# Altium PCB PCB2.PcbDoc
Units mm, origin at the board's own origin, x right, y up, seen from the top; angles counter-clockwise.
Board outline 174.88 x 101.98 mm, 4 copper layers (SIGNAL/POWER1, GND1, GND2, SIGNAL/POWER2), stack 0.603 mm thick; 123 components, 74 nets, 366 pads, 6 vias.
Unrouted connection lines stored in the file: 192.
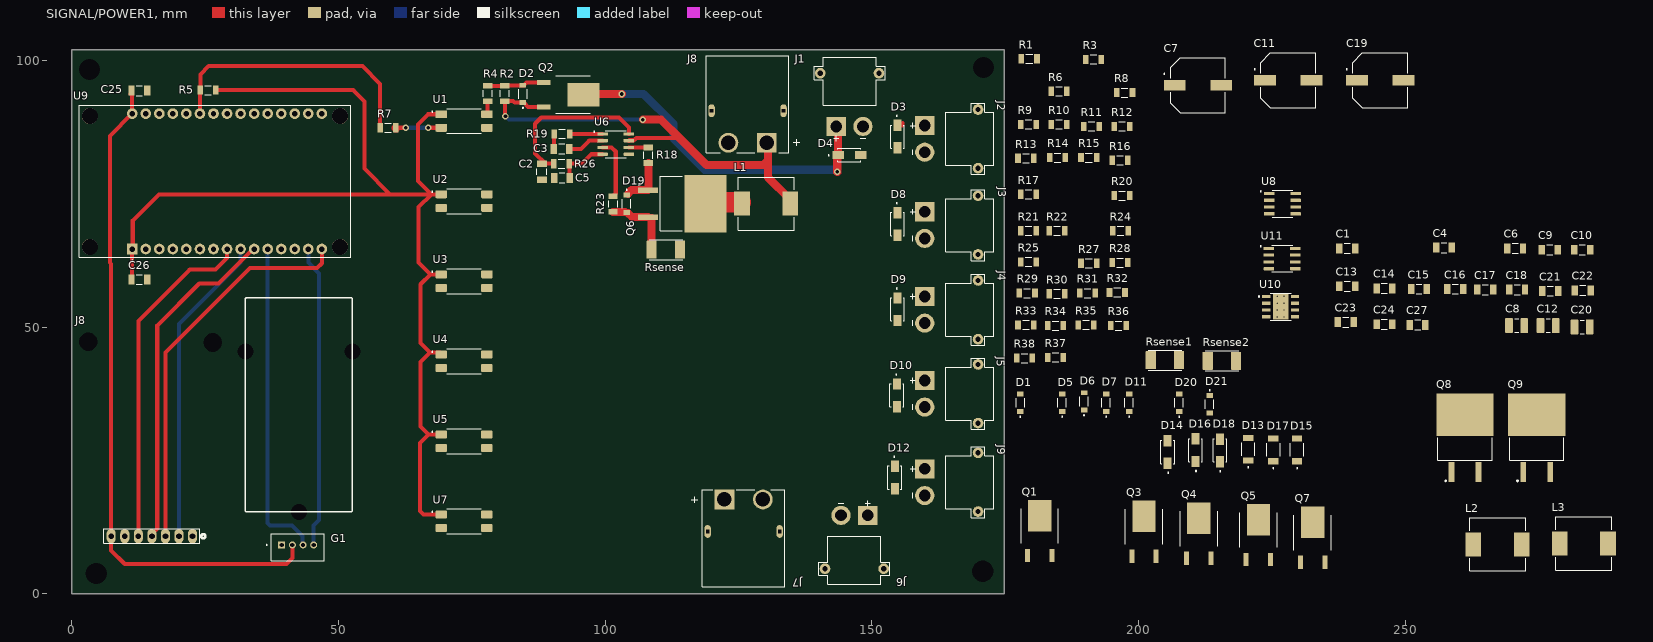
[diagram p0: SIGNAL/POWER1 view]
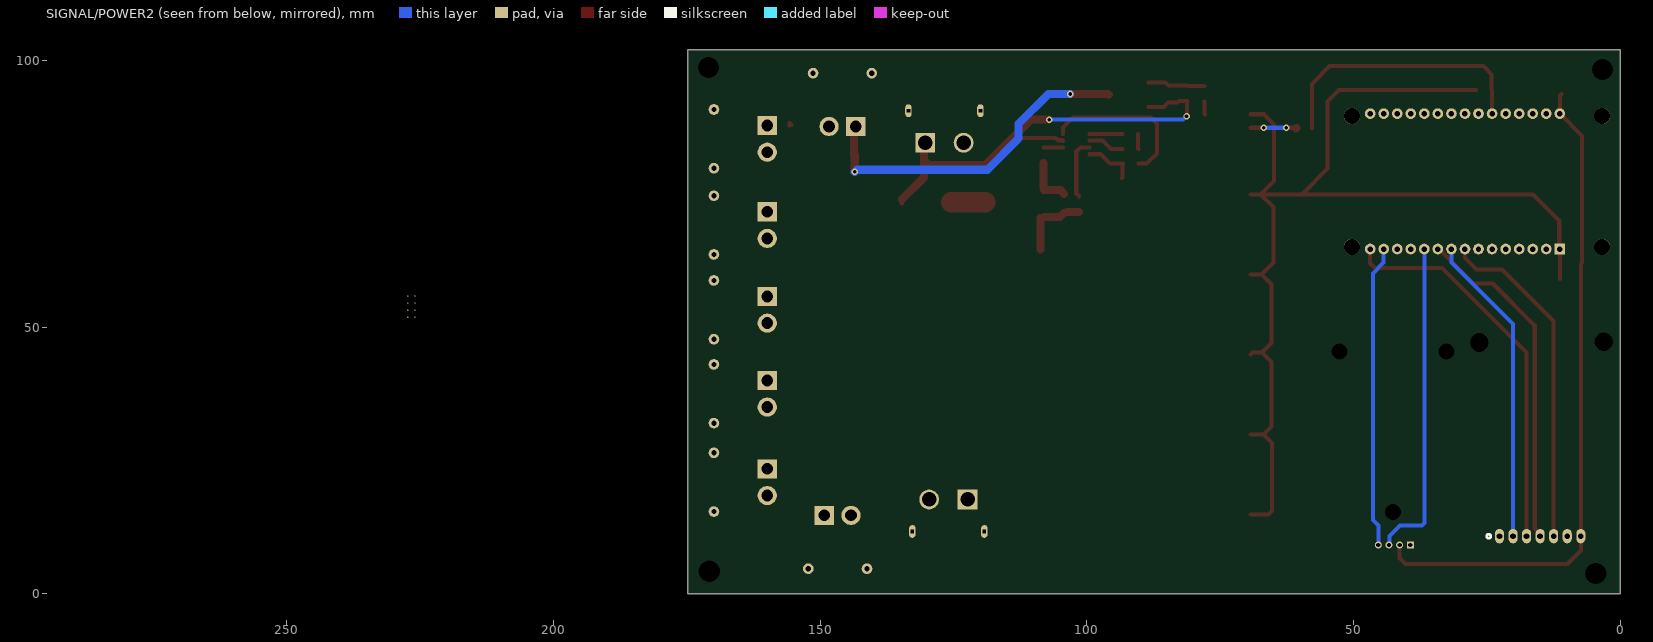
[diagram p1: SIGNAL/POWER2 view, seen from below]

## Layer stack, top to bottom
Top Solder: solder mask 0.0102, Solder Resist, Dk 3.5
SIGNAL/POWER1: signal copper 0.035
Dielectric 2: prepreg 0.0711, PP-006, Dk 4.1
GND1: signal copper 0.0356
Dielectric 1: dielectric 0.32, FR-4, Dk 4.8
GND2: signal copper 0.0356
Dielectric 3: prepreg 0.0711, PP-006, Dk 4.1
SIGNAL/POWER2: signal copper 0.035
Bottom Solder: solder mask 0.0102, Solder Resist, Dk 3.5

## Board outline
0,0 174.879,0 174.879,101.981 0,101.981

## Design rules (kind name [scope] priority, off if disabled: settings)
AssemblyTestPointUsage [All] p1: isadvanced=TRUE
AssemblyTestpoint [All] p1: isadvanced=TRUE testpointundercomponent=TRUE minsize=1.016 maxsize=2.54 preferedsize=1.524 minholesize=0 maxholesize=1.016 preferedholesize=0.813 testpointgrid=0.025 usegrid=TRUE gridtolerance=0 allowsidetop=TRUE allowsidebottom=TRUE
Clearance Clearance_1 [(ExistsOnLayer('GND1') Or ExistsOnLayer('GND2')) vs (ExistsOnLayer('GND1') Or ExistsOnLayer('GND2'))] p1: gap=0.254 ignorepadtopadclearanceinfootprint=FALSE sourcerule=38 cellrowname=All cellrowtype=0 cellcolname=All cellcoltype=0 innerlayers=TRUE
Clearance Clearance_2 [(ExistsOnLayer('SIGNAL/POWER1') Or ExistsOnLayer('SIGNAL/POWER2')) vs (ExistsOnLayer('SIGNAL/POWER1') Or ExistsOnLayer('SIGNAL/POWER2'))] p2: gap=0.254 ignorepadtopadclearanceinfootprint=FALSE sourcerule=38 cellrowname=All cellrowtype=0 cellcolname=All cellcoltype=0 outerlayers=TRUE
Clearance [All] p3: gap=0.254 ignorepadtopadclearanceinfootprint=FALSE ismatrix=TRUE
ComponentClearance [All] p1: isadvanced=TRUE gap=0.254 collisioncheckmode=3 verticalgap=0.254 showdistances=FALSE
FabricationTestPointUsage [All] p1: isadvanced=TRUE valid=0 allowmultiple=FALSE
FabricationTestpoint [All] p1: isadvanced=TRUE side=3 testpointundercomponent=TRUE minsize=1.016 maxsize=2.54 preferedsize=1.524 minholesize=0 maxholesize=1.016 preferedholesize=0.813 testpointgrid=0.025 allowsidetop=TRUE allowsidebottom=TRUE usegrid=TRUE gridtolerance=0
FanoutControl Fanout_BGA [IsBGA] p1: isadvanced=TRUE bgadir=Out bgaviamode=Centered fanoutstyle=Auto fanoutdirection=Alternating viagrid=0.025 // Fanout_BGA (Default Rule)
FanoutControl Fanout_LCC [IsLCC] p2: isadvanced=TRUE bgadir=Out bgaviamode=Centered fanoutstyle=Auto fanoutdirection=Alternating viagrid=0.025 // Fanout_LCC (Default Rule)
FanoutControl Fanout_SOIC [IsSOIC] p3: isadvanced=TRUE bgadir=Out bgaviamode=Centered fanoutstyle=Auto fanoutdirection=Alternating viagrid=0.025 // Fanout_SOIC (Default Rule)
FanoutControl Fanout_Small [(CompPinCount < 5)] p4: isadvanced=TRUE bgadir=Out bgaviamode=Centered fanoutstyle=Auto fanoutdirection=OutThenIn viagrid=0.025 // Fanout_Small (Default Rule)
FanoutControl Fanout_Default [All] p5: isadvanced=TRUE bgadir=Out bgaviamode=Centered fanoutstyle=Auto fanoutdirection=Alternating viagrid=0.025 // Fanout_Default (Default Rule)
Height [All] p1: isadvanced=TRUE minheight=0 maxheight=25.4 prefheight=12.7
HoleSize [All] p1: isadvanced=TRUE absolutevalues=TRUE maxlimit=2.54 minlimit=0.025 maxpercent=80.000 minpercent=20.000
HoleToHoleClearance [All] p1: isadvanced=TRUE gap=0.254 allowstackedmicrovias=TRUE
LayerPairs [All] p1: isadvanced=TRUE enforce=TRUE
MinimumSolderMaskSliver [All] p1: isadvanced=TRUE minsoldermaskwidth=0.254
NetAntennae [All] p1: isadvanced=TRUE netantennaetolerance=0
PasteMaskExpansion [All] p1: isadvanced=TRUE expansion=0
PlaneClearance [All] p1: isadvanced=TRUE clearance=0.508
PlaneConnect [All] p1: isadvanced=TRUE planeconnectstyle=Relief reliefexpansion=0.508 reliefentries=4 reliefconductorwidth=0.254 reliefairgap=0.254
PolygonConnect [All] p1: connectstyle=Relief reliefconductorwidth=0.254 reliefentries=4 polygonreliefangle="90 Angle" airgapwidth=0.254
RoutingCorners [All] p1: isadvanced=TRUE cornerstyle=45-Degree minsetback=2.54 maxsetback=2.54
RoutingPriority [All] p1: isadvanced=TRUE routingpriority=0
RoutingVias [All] p1: holewidth=0.711 width=1.27 viastyle="Through Hole" minholewidth=0.711 minwidth=1.27 maxholewidth=0.711 maxwidth=1.27
ShortCircuit [All] p1: isadvanced=TRUE allowed=FALSE
SilkToSilkClearance [All] p1: isadvanced=TRUE silktosilkclearance=0.254
SilkToSolderMaskClearance [IsPad] p1: isadvanced=TRUE minsilkscreentomaskgap=0.254 clearancetoexposedcopper=TRUE
SolderMaskExpansion [All] p1: isadvanced=TRUE expansion=0 istentingtop=FALSE
SupplyNets "Schematic Supply Nets" [InNet('GND')] p1: isadvanced=TRUE voltage=0.000
UnRoutedNet [All] p1: isadvanced=TRUE
UnpouredPolygon [All] p1: isadvanced=TRUE
Width MaxMinWidth_1 [All] p1: isadvanced=TRUE maxlimit=3.81 minlimit=0.762 preferedwidth=1.524 toplayer_prefwidth=0.762 minimp=50.000000 maximp=50.000000 favimp=50.000000
Width [All] p2: maxlimit=0.254 minlimit=0.254 preferedwidth=0.254
4 further rules are at their usual default settings.

## Classes and differential pairs
component class Fuentes: C1 C2 C3 C4 C5 C6 C7 C8 C9 C10 C11 C12 C13 C14 C15 C16 C17 C18 C19 C20 C21 C22 C23 C24 C? D11 D12 D13 D14 D15 D16 D17 D18 D19 D20 D21 J9 L1 L2 L3 Q6 Q7 Q8 Q9 Q? R18 R19 R20 R21 R22 R23 R24 R25 R26 R27 R28 R29 R30 R31 R32 R33 R34 R35 R36 R37 R38 Rsense Rsense1 Rsense2 U6 U7 U8 U11
component class Control: 3 C25 C26 C27 D1 D2 D3 D4 D5 D6 D7 D8 D9 D10 G1 J1 J2 J3 J4 J5 J6 J7 Q1 Q2 Q3 Q4 Q5 R1 R2 R3 R4 R5 R6 R7 R8 R9 R10 R11 R12 R13 R14 R15 R16 R17 U1 U2 U3 U4 U5 U10

## Components (designator, comment, footprint, x,y, rotation, side; value= is the part's Value field where it differs from the comment)
C1 "100nF" "Cap SMD 1206" 239.141,64.77 r0 top
C2 "100nF" "Cap SMD 1206" 88.138,79.121 r270 top
C3 "10nF" "Cap SMD 1206" 91.821,83.439 r180 top
C4 "100pF" "Cap SMD 1206" 257.302,64.897 r0 top
C5 "1nF" "Cap SMD 1206" 91.901,77.978 r180 top
C6 "10uF" "Cap SMD 1206" 270.637,64.77 r0 top
C7 "Cap 100uF 63v" "Cap 100uH 63v" 211.169,95.25 r0 top
C8 "10uF 100v" "Cap SMD 1210" 270.924,50.292 r0 top
C9 "100nF" "Cap SMD 1206" 277.114,64.516 r0 top
C10 "10uF" "Cap SMD 1206" 283.21,64.516 r0 top
C11 "Cap 100uF 63v" "Cap 100uH 63v" 228.092,96.139 r0 top
C12 "10uF 100v" "Cap SMD 1210" 276.827,50.292 r0 top
C13 "100nF" "Cap SMD 1206" 239.141,57.658 r0 top
C14 "1nF" "Cap SMD 1206" 246.126,57.277 r0 top
C15 "100pF" "Cap SMD 1206" 252.603,57.15 r0 top
C16 "10nF" "Cap SMD 1206" 259.414,57.15 r0 top
C17 "100nF" "Cap SMD 1206" 265.049,57.023 r0 top
C18 "10uF" "Cap SMD 1206" 271.018,57.023 r0 top
C19 "Cap 100uF 63v" "Cap 100uH 63v" 245.364,96.139 r0 top
C20 "10uF 100v" "Cap SMD 1210" 283.21,50.038 r0 top
C21 "100nF" "Cap SMD 1206" 277.241,56.769 r0 top
C22 "1nF" "Cap SMD 1206" 283.337,56.896 r0 top
C23 "100pF" "Cap SMD 1206" 238.887,50.927 r0 top
C24 "10nF" "Cap SMD 1206" 246.126,50.546 r0 top
C25 "100nF" "Cap SMD 1206" 12.649,94.361 r0 top
C26 "100nF" "Cap SMD 1206" 12.649,58.928 r0 top
C27 "100nF" "Cap SMD 1206" 252.349,50.419 r0 top
D1 "Zener 15v" "Zener 15v 500mW SMD" 177.859,35.814 r90 top
D2 "Zener 15v" "Zener 15v 500mW SMD" 84.582,93.726 r90 top
D3 "Diodo TVS" "Diodo TVS" 154.813,85.725 r270 top
D4 "Diodo TVS" "Diodo TVS" 145.796,82.296 r0 top
D5 "Zener 15v" "Zener 15v 500mW SMD" 185.674,35.814 r90 top
D6 "Zener 15v" "Zener 15v 500mW SMD" 189.797,36.068 r90 top
D7 "Zener 15v" "Zener 15v 500mW SMD" 193.929,35.83 r90 top
D8 "Diodo TVS" "Diodo TVS" 154.813,69.342 r270 top
D9 "Diodo TVS" "Diodo TVS" 154.813,53.34 r270 top
D10 "Diodo TVS" "Diodo TVS" 154.686,37.211 r270 top
D11 "Zener 15v" "Zener 15v 500mW SMD" 198.247,35.83 r90 top
D12 "Diodo TVS" "Diodo TVS" 154.305,21.8 r270 top
D13 "Diodo Shottky" "Diodo Sottky SS510FSH" 220.599,27.095 r90 top
D14 "Diodo TVS" "Diodo SMAJ28A TVS" 205.486,26.587 r90 top
D15 "Diodo Shottky" "Diodo Sottky SS510FSH" 229.743,26.968 r90 top
D16 "Diodo TVS" "Diodo SMAJ28A TVS" 210.693,26.924 r90 top
D17 "Diodo Shottky" "Diodo Sottky SS510FSH" 225.298,26.968 r90 top
D18 "Diodo TVS" "Diodo SMAJ28A TVS" 215.265,26.88 r90 top
D19 "Zener 15v" "Zener 15v 500mW SMD" 104.013,73.136 r270 top
D20 "Zener 15v" "Zener 15v 500mW SMD" 207.645,35.814 r90 top
D21 "Zener 15v" "Zener 15v 500mW SMD" 213.36,35.56 r270 top
G1 "4pin Grove connector" "4 pin grove conector" 42.339,9.144 r0 top
J1 "xt30_90" XT30_90 146.369,78.504 r0 top
J2 "xt30_90" XT30_90 150.802,84.772 r270 top
J3 "xt30_90" XT30_90 150.802,68.594 r270 top
J4 "xt30_90" XT30_90 150.802,52.719 r270 top
J5 "xt30_90" XT30_90 150.802,36.971 r270 top
J6 "xt30_90" XT30_90 146.191,23.825 r180 top
J7 "Xt60_90" Xt60_90 128.886,-27.305 r0 top
J8 "MCP2515" MCP2515 15.367,30.226 r270 top
J8 "Xt60_90" Xt60_90 123.781,129.571 r180 top
J9 "xt30_90" XT30_90 150.802,20.383 r270 top
L1 "33uH inductor" "33uH Inductor" 130.302,73.152 r180 top
L2 "33uH inductor" "33uH Inductor" 267.208,9.271 r0 top
L3 "33uH inductor" "33uH Inductor" 283.417,9.398 r0 top
Q1 "IRF5505" irf5505 181.483,12.7 r0 top
Q2 "IRF5505" irf5505 93.98,93.599 r270 top
Q3 "IRF5505" irf5505 201.041,12.573 r0 top
Q4 "IRF5505" irf5505 211.328,12.192 r0 top
Q5 "IRF5505" irf5505 222.504,11.938 r0 top
Q6 "IRFS4010" IRFS4010 113.411,73.152 r0 top
Q7 "IRF5505" irf5505 232.664,11.43 r0 top
Q8 "IRFS4010" IRFS4010 261.239,28.194 r90 top
Q9 "IRFS4010" IRFS4010 274.701,28.194 r90 top
R1 "10k" "Resistencia 1306" 164.655,101.219 r0 top
R2 "10k" "Resistencia 1306" 80.264,78.93 r90 top
R3 "22k" "Resistencia 1306" 176.721,101.092 r0 top
R4 "22k" "Resistencia 1306" 77.089,78.931 r90 top
R5 "10k" "Resistencia 1306" 40.399,93.552 r180 top
R6 "330" "Resistencia 1306" 170.244,95.123 r0 top
R7 "330" "Resistencia 1306" 74.105,86.487 r180 top
R8 "10k" "Resistencia 1306" 182.562,94.869 r0 top
R9 "10k" "Resistencia 1306" 164.503,88.9 r0 top
R10 "10k" "Resistencia 1306" 170.218,88.9 r0 top
R11 "22k" "Resistencia 1306" 176.314,88.519 r0 top
R12 "22k" "Resistencia 1306" 182.029,88.519 r0 top
R13 "22k" "Resistencia 1306" 164.02,82.55 r0 top
R14 "330" "Resistencia 1306" 169.99,82.677 r0 top
R15 "330" "Resistencia 1306" 175.831,82.677 r0 top
R16 "330" "Resistencia 1306" 181.673,82.169 r0 top
R17 "Resistencia 1206 SMD" "Resistencia 1306" 164.528,75.819 r0 top
R18 "10" "Resistencia 1306" 108.966,97.091 r270 top
R19 "10K" "Resistencia 1306" 77.025,87.122 r0 top
R20 "10k" "Resistencia 1306" 182.054,75.565 r0 top
R21 "22k" "Resistencia 1306" 164.529,68.961 r0 top
R22 "330" "Resistencia 1306" 169.862,68.961 r0 top
R23 "1k" "Resistencia 1306" 102.362,87.947 r270 top
R24 "180k" "Resistencia 1306" 211.519,67.183 r180 top
R25 "9.88k" "Resistencia 1306" 194.246,61.341 r180 top
R26 "9.53k" "Resistencia 1306" 76.945,81.534 r0 top
R27 "180k" "Resistencia 1306" 205.549,61.087 r180 top
R28 "9.53k" "Resistencia 1306" 211.392,61.214 r180 top
R29 "1k" "Resistencia 1306" 193.993,55.499 r180 top
R30 "10" "Resistencia 1306" 169.862,57.15 r0 top
R31 "9.88k" "Resistencia 1306" 205.296,55.499 r180 top
R32 "10K" "Resistencia 1306" 181.166,57.404 r0 top
R33 "180k" "Resistencia 1306" 193.738,49.53 r180 top
R34 "9.53k" "Resistencia 1306" 199.326,49.403 r180 top
R35 "1k" "Resistencia 1306" 205.041,49.53 r180 top
R36 "10" "Resistencia 1306" 181.42,51.181 r0 top
R37 "9.88k" "Resistencia 1306" 199.327,43.434 r180 top
R38 "10K" "Resistencia 1306" 163.766,45.085 r0 top
Rsense "0.15" "R SMD 2512" 111.379,64.516 r180 top
Rsense1 "0.15" "R SMD 2512" 204.978,43.815 r0 top
Rsense2 "0.15" "R SMD 2512" 215.653,43.688 r180 top
U1 "PC817X3NSZ1B" PC817X3NSZ1B 73.406,88.646 r0 top
U2 "PC817X3NSZ1B" PC817X3NSZ1B 73.406,73.635 r0 top
U3 "PC817X3NSZ1B" PC817X3NSZ1B 73.406,58.623 r0 top
U4 "PC817X3NSZ1B" PC817X3NSZ1B 73.406,43.612 r0 top
U5 "PC817X3NSZ1B" PC817X3NSZ1B 73.406,28.6 r0 top
U6 "UC2843NG4" UC3843 102.108,84.328 r0 top
U7 "PC817X3NSZ1B" PC817X3NSZ1B 73.406,13.589 r0 top
U8 "UC2843NG4" UC3843 227.133,73.152 r0 top
U9 "Esp32 30 pin" "ESP32 30 pin" 24.586,76.276 r90 top
U10 "DRV8871" DRV8871 226.807,53.579 r0 top
U11 "UC2843NG4" UC3843 227.076,62.865 r0 top

## Footprints (in the part's own frame and the unit in brackets; to place one, negate y for a bottom-side part, rotate by r counter-clockwise, add the part's x,y. Pads: shape width x height; smd on the part's side, far side on the other; paste and mask are expansions set on the pad)
"4 pin grove conector" [mm]
  rect 1.308x1.308 / inner round 1.308 / far side rect 1.308x1.308 hole 0.8: 1(-3,0)
  round 1.308 hole 0.8: 2(-1,0) 3(1,0) 4(3,0)
  silkscreen extent -5.9,-2.95 5,2.15, body extent -5,-2.95 5,2.15, height 8.1
"33uH Inductor" [mm]
  rect 2.95x4.5 smd: 1(-4.398,0) 2(4.652,0)
  silkscreen extent -5.12,-5 5.38,5, body extent -5.12,-5 5.38,5, height 6.51
"Cap 100uH 63v" [mm]
  rect 4.1x2 smd: 1(-4.35,0.127) 2(4.35,0.127)
  silkscreen extent -6.4,-5.02 5.15,5.28, body extent -5.5,-5.02 5.5,5.28, height 11.52
"Cap SMD 1206" [mm]
  rect 1.21x1.86 smd: 1(-1.477,0) 2(1.477,0)
  silkscreen extent -0.55,-0.93 0.55,0.93, body extent -1.6,-0.8 1.6,0.8, height 1.7
"Cap SMD 1210" [mm]
  rrect25% 1.45x2.81 smd paste+0 mask+0.102: 1(-1.43,0) 2(1.43,0)
  silkscreen extent -0.39,-1.25 0.39,1.25, body extent -1.6,-1.25 1.6,1.25, height 2.8
"Diodo SMAJ28A TVS" [mm]
  rect 2.12x1.5 smd: A(2.115,0) C(-2.115,0)
  silkscreen extent -4,-1.28 2.16,1.28, body extent -2.57,-1.28 2.57,1.28, height 2.5
"Diodo Sottky SS510FSH" [mm]
  rect 1.17x1.92 smd: A(2.125,0) C(-2.125,0)
  silkscreen extent -3.5,-1.25 1.22,1.25, body extent -2.35,-1.25 2.35,1.25, height 1.1
"Diodo TVS" [mm]
  rect 2.12x1.5 smd: A(2.115,0) C(-2.115,0)
  silkscreen extent -4,-1.28 2.16,1.28, body extent -2.47,-1.3 2.72,1.3, height 2.21
DRV8871 [mm]
  rrect5% 1.55x0.6 smd mask+0: 1(-2.827,2.159) 2(-2.827,0.889) 3(-2.827,-0.381) 4(-2.827,-1.651) 5(2.573,-1.651) 6(2.573,-0.381) 7(2.573,0.889) 8(2.573,2.159)
  rect 2.95x4.9 smd paste-3 mask+0: 9(-0.127,0.254)
  round 0.3 hole 0.2: 10(-0.777,2.204) 11(0.523,2.204) 12(-0.777,0.904) 13(0.523,0.904) 14(-0.777,-0.396) 15(0.523,-0.396) 16(-0.777,-1.696) 17(0.523,-1.696)
  silkscreen extent -4.3,-2.27 1.82,2.78, body extent -3.13,-2.2 2.87,2.7, height 1.7
"ESP32 30 pin" [mm]
  rect 2x2 / inner round 2 / far side rect 2x2 hole 1.02: 1(-11.633,13.28)
  round 2 hole 1.02: 2(-11.633,10.74) 3(-11.633,8.2) 4(-11.633,5.66) 5(-11.633,3.12) 6(-11.633,0.58) 7(-11.633,-1.96) 8(-11.633,-4.5) 9(-11.633,-7.04) 10(-11.633,-9.58) 11(-11.633,-12.12) 12(-11.633,-14.66) 13(-11.633,-17.2) 14(-11.633,-19.74) 15(-11.633,-22.28) 16(13.767,-22.28) 17(13.767,-19.74) 18(13.767,-17.2) 19(13.767,-14.66) 20(13.767,-12.12) 21(13.767,-9.58) 22(13.767,-7.04) 23(13.767,-4.5) 24(13.767,-1.96) 25(13.767,0.58) 26(13.767,3.12) 27(13.767,5.66) 28(13.767,8.2) 29(13.767,10.74) 30(13.767,13.28)
  round 3 hole 3 unplated: ""(-11.213,21.24) ""(-11.213,-25.71) ""(13.297,21.24) ""(13.297,-25.71)
  silkscreen extent -13.88,-27.71 15.3,23.24, body extent -12.85,-27.86 15.35,24.59, height 7.05
irf5505 [mil]
  rect 37x98 smd: 1(-90.16,-217.5) 3(90.16,-217.5)
  rect 172x233 smd: 2(0,77)
  silkscreen extent -138,-128 138,128, body extent -129,-225 129,165, height 94
IRFS4010 [mm]
  rect 3.8x1.05 smd paste+0 mask+0: 1(-5.375,2.54) 3(-5.375,-2.54)
  rect 7.9x10.75 smd paste+0 mask+0: 2(5.375,0)
  silkscreen extent -7.15,-5.1 1.08,5.1, body extent -6.6,-5.08 8.65,5.08, height 5.08
MCP2515 [mm]
  oval 2.7x1.7 hole 1.1: Cs(19.431,-2.921) GND(19.431,-5.461) Int(19.431,7.239) Miso(19.431,-0.381) Mosi(19.431,2.159) Sck(19.431,4.699) Vcc(19.431,-8.001)
  silkscreen extent 18.06,-9.4 20.8,9.65, body extent -19.42,-14.51 20.7,13.49, height 11.69
PC817X3NSZ1B [mm]
  rrect25% 2.15x1.48 smd: 1(-4.153,1.27) 2(-4.153,-1.27) 3(4.407,-1.27) 4(4.407,1.27)
  silkscreen extent -5.9,-2.33 3.38,2.33, body extent -4.75,-2.29 5,2.29, height 4
"R SMD 2512" [mm]
  rrect7% 1.9x3.37 smd: 1(-2.66,0) 2(2.66,0)
  silkscreen extent -3.15,-1.87 3.15,1.87, body extent -3.18,-1.58 3.18,1.58, height 0.7
"Resistencia 1306" [mm]
  rect 1.05x1.72 smd: 1(13.399,-0.889) 2(16.319,-0.889)
  silkscreen extent 14.24,-1.74 15.48,-0.04, body extent 13.31,-1.66 16.41,-0.11, height 0.65
UC3843 [mm]
  rrect25% 1.97x0.6 smd paste+0 mask+0.102: 1(-2.597,1.905) 2(-2.597,0.635) 3(-2.597,-0.635) 4(-2.597,-1.905) 5(2.343,-1.905) 6(2.343,-0.635) 7(2.343,0.635) 8(2.343,1.905)
  silkscreen extent -4.27,-2.52 1.82,2.52, body extent -3.12,-2.45 2.87,2.45, height 1.75
XT30_90 [mm]
  round 3.6 hole 2.2: N(1.967,9.126)
  rect 3.6x3.6 hole 2.2: P(-3.033,9.126)
  round 2 hole 1: S1(4.967,19.126) S2(-6.033,19.126)
  silkscreen extent -7.18,6.38 6.12,22.08, body extent -7.18,8.13 6.12,22.08, height 5
Xt60_90 [mm]
  rect 3.716x3.716 / inner round 3.716 / far side rect 3.716x3.716 hole 2.7 mask+0.102: 1(-6.521,44.989)
  round 3.716 hole 2.7 mask+0.102: 2(0.679,44.989)
  oval 1.2x2.4 hole 0.6 square mask+0.102: SH1(-9.671,38.989) SH2(3.829,38.989)
  silkscreen extent -12.72,28.64 4.83,46.84, body extent -10.67,28.64 4.83,46.84, height 8.4
"Zener 15v 500mW SMD" [mm]
  rect 0.91x1.22 smd paste+0 mask+0.102: 1(-1.635,0) 2(1.635,0)
  silkscreen extent -2.7,-0.8 0.86,0.8, body extent -1.84,-0.8 1.84,0.8, height 1.35

## Part data
C1 C2 C3 C4 C5 C6 C9 C10 C13 C14 C15 C16 C17 C18 C21 C22 C23 C24 C25 C26 C27: library part "Cap SMD 1206"
C7 C11 C19: library part "Cap 100uH 63v"
C8 C12 C20: library part "Cap SMD 1210"
D1 D2 D5 D6 D7 D11 D19 D20 D21: library part "Zener 15v 500mW SMD"
D3 D4 D8 D9 D10 D12: library part "Diodo TVS SMAJ51"
D14 D16 D18: library part "Diodo SMAJ28A TVS"
R1 R2 R3 R4 R5 R6 R7 R8 R9 R10 R11 R12 R13 R14 R15 R16 R17 R18 R19 R20 R21 R22 R23 R24 R25 R26 R27 R28 R29 R30 R31 R32 R33 R34 R35 R36 R37 R38: library part "Resistencia 1306 SMD"
Rsense Rsense1 Rsense2: library part "R SMD 2512"
U9: "Dual core, Wi-Fi: 2.4 GHz up to 150 Mbits/s,BLE (Bluetooth Low Energy) and legacy Bluetooth, 32 bits, Up to 240 MHz"

## Free pads (board coordinates)
  round 1.524 hole 4: 4(3.302,98.298) 4(4.572,3.81) 4(170.815,4.191) 4(170.942,98.679)
  round 1.524 hole 3: 4(32.512,45.466) 4(42.545,15.367) 4(52.578,45.466)
  round 1.524 hole 3.5: 23(3.048,47.244) 23(26.416,47.117)

## Via types
v1: diameter 1.27, hole 0.711, SIGNAL/POWER1 to SIGNAL/POWER2, 4 vias
v2: diameter 1.27, hole 0.7, SIGNAL/POWER1 to SIGNAL/POWER2, 2 vias

## Nets (pads, with @x,y where several pads share a name; then routed paths per layer and width w, separated by ;. In a path a pad name is that pad's centre, name@x,y a point inside that pad or via, vN(x,y) a via of type N, cw(c..) or ccw(c..) an arc to the next point about the centre after c; other vN are vias at no path point)
GND: C1.2 C2.2 C4.2 C5.2 C6.1 C7.2 C8.1 C9.2 C10.1 C11.2 C12.1 C13.2 C14.2 C15.2 C17.2 C18.1 C19.2 C20.1 C21.2 C22.2 C23.2 C25.2 C26.2 C27.1 D3.A D4.A D8.A D9.A D10.A D12.A D14.A D16.A D18.A G1.1 J1.N J2.N J3.N J4.N J5.N J7.2 J7.SH1 J7.SH2 J8.2 J8.GND J8.SH1 J8.SH2 J9.N R17.2 R25.1 R31.1 R37.1 Rsense1.1 Rsense2.1 Rsense.1 U1.3 U2.3 U3.3 U4.3 U5.3 U6.5 U7.3 U8.5 U9.2 U9.29 U10.1 U10.7 U11.5
NetC1_1: C1.1 C6.2 C9.1 C10.2 C17.1 C18.2 D2.1 D6.1 D7.1 D14.C D16.C D18.C J8.1 L1.1 L2.1 L3.1 Q2.3 Q4.3 Q5.3 R2.1 R9.1 R10.1 U6.7 U8.7 U11.7 | length 87.9
  SIGNAL/POWER1 w0.762: v1(81.28,89.535) 81.216,89.599 81.216,92.266 R2.1 81.247,92.423 82.71,92.423 83.042,92.091 D2.1 84.737,92.091 85.519,91.309 Q2.3 ; L1.1 L1.1@134.7,73.927
  SIGNAL/POWER1 w0.8: U6.7 104.551,85.063 105.368,85.063 105.584,85.279 105.663,85.279 105.855,85.471 113.919,85.471
  SIGNAL/POWER1 w1.5: v1(107.061,88.9) 110.49,88.9 113.919,85.471 ; 130.556,82.169 130.556,78.071 L1.1@134.7,73.927
  SIGNAL/POWER1 w1.52: 113.919,85.471 118.999,80.391 129.666,80.391 130.556,81.281 130.556,82.169 130.556,84.328 J8.1
  SIGNAL/POWER2 w0.762: v1(81.28,89.535) 81.345,89.535 81.98,88.9 v1(107.061,88.9)
NetC2_1: C2.1 R26.1 U6.8 | length 29.9
  SIGNAL/POWER1 w0.762: R26.1 88.773,80.645 86.868,82.55 86.868,88.138 88.011,89.281 102.616,89.281 104.451,87.446 U6.8
NetC3_1: C3.1 R24.1 R25.2 U6.2 | length 6.8
  SIGNAL/POWER1 w0.762: C3.1 95.493,83.439 97.017,84.963 U6.2
NetC3_2: C3.2 R19.1 | length 2.8
  SIGNAL/POWER1 w0.762: C3.2 90.384,83.479 90.384,86.193 R19.1
NetC4_1: C4.1 R23.1 U6.3 | length 11.4
  SIGNAL/POWER1 w0.762: U6.3 101.219,83.693 101.981,82.931 101.981,75.056 R23.1
NetC5_1: C5.1 R26.2 U6.4 | length 9.7
  SIGNAL/POWER1 w0.762: C5.1 93.321,78.035 93.321,80.588 R26.2 95.631,80.645 97.409,82.423 U6.4
NetC7_1: C7.1 C8.2 D1.1 D13.C Q1.3 R1.1 R24.2
NetC11_1: C11.1 C12.2 D5.1 D15.C Q3.3 R8.1 R27.2
NetC13_1: C13.1 R28.1 U8.8
NetC14_1: C14.1 R28.2 U8.4
NetC15_1: C15.1 R29.2 U8.3
NetC16_1: C16.1 R27.1 R31.2 U8.2
NetC16_2: C16.2 R32.1
NetC19_1: C19.1 C20.2 D11.1 D17.C Q7.3 R20.1 R33.2
NetC21_1: C21.1 R34.1 U11.8
NetC22_1: C22.1 R34.2 U11.4
NetC23_1: C23.1 R35.2 U11.3
NetC24_1: C24.1 R33.1 R37.2 U11.2
NetC24_2: C24.2 R38.1
NetC25_1: C25.1 G1.2 J8.Vcc U9.30 | length 125.2
  SIGNAL/POWER1 w0.762: C25.1@10.998,93.714 11.24,93.472 11.24,90.415 U9.30@11.307,90.348 ; U9.30 7.112,85.849 7.112,62.103 7.366,61.849 J8.Vcc 7.366,8.128 9.906,5.588 40.259,5.588 41.339,6.668 G1.2
NetC26_1: C26.1 R5.1 U1.1 U2.1 U3.1 U4.1 U5.1 U7.1 U9.1 | length 214
  SIGNAL/POWER1 w0.762: C26.1@11.24,58.996 U9.1@11.24,64.643 ; U9.1 U9.1@11.43,64.767 ; 11.43,69.977 16.358,74.905 59.69,74.905 ; R5.1 52.752,94.441 54.864,92.329 54.864,79.731 59.69,74.905 ; U7.1 65.913,14.859 65.278,15.494 65.278,28.245 66.904,29.87 ; U5.1 66.904,29.87 ; U4.1 68.894,45.241 67.154,45.241 ; U3.1 67.259,59.893 ; U2.1 67.412,74.905 ; U1.1 66.802,89.916 64.897,88.011 64.897,77.419 67.412,74.905 ; 59.69,74.905 67.412,74.905 ; 66.904,29.87 65.405,31.369 65.405,43.492 67.154,45.241 ; 67.154,45.241 65.405,46.99 65.405,58.039 67.259,59.893 ; 67.259,59.893 65.024,62.128 65.024,72.517 67.412,74.905
  SIGNAL/POWER1 w0.8: U9.1@11.43,64.767 11.43,69.977
NetC27_2: C27.2 J7.1 U10.5
NetD1_2: D1.2 Q1.1 R1.2 R3.2
NetD2_2: D2.2 Q2.1 R2.2 R4.2 | length 10.7
  SIGNAL/POWER1 w0.762: R4.2 R2.2 ; R2.2 81.209,95.305 84.681,95.305 85.265,95.889 Q2.1
NetD3_C: D3.C J2.P Q1.2 | length 0.6
  SIGNAL/POWER1 w0.762: D3.C@155.406,87.896 155.775,88.265 ; 155.775,87.84 155.775,87.896
NetD4_C: D4.C J1.P Q2.2 | length 64.2
  SIGNAL/POWER1 w0.762: J1.P J1.P@143.681,87.285
  SIGNAL/POWER1 w1.52: Q2.2 95.885,93.599 96.012,93.726 v2(103.124,93.726) ; v2(143.51,79.121) 143.51,82.286 143.52,82.296 D4.C J1.P@143.681,87.285
  SIGNAL/POWER2 w1.52: v2(103.124,93.726) 107.188,93.726 112.776,88.138 112.776,85.344 118.618,79.502 143.129,79.502 v2(143.51,79.121)
NetD5_2: D5.2 Q3.1 R8.2 R11.2
NetD6_2: D6.2 Q4.1 R9.2 R12.2
NetD7_2: D7.2 Q5.1 R10.2 R13.2
NetD8_C: D8.C J3.P Q3.2
NetD9_C: D9.C J4.P Q4.2
NetD10_C: D10.C J5.P Q5.2
NetD11_2: D11.2 Q7.1 R20.2 R21.2
NetD12_C: D12.C J9.P Q7.2
NetD13_A: D13.A L1.2 Q6.2 | length 6.4
  SIGNAL/POWER1 w3.81: Q6.2@119.04,73.406 L1.2@125.396,73.406
NetD15_A: D15.A L2.2 Q8.2
NetD17_A: D17.A L3.2 Q9.2
NetD19_1: D19.1 Q6.1 R18.2 | length 9.1
  SIGNAL/POWER1 w0.762: D19.1 104.168,74.771 104.242,74.845 D19.1@104.242,75.01
  SIGNAL/POWER1 w1.5: D19.1@104.242,75.01 104.924,75.692 Q6.1 ; Q6.1@108.036,76.2 108.077,76.241 R18.2
NetD19_2: D19.2 Q6.3 R23.2 Rsense.2 | length 13.4
  SIGNAL/POWER1 w0.762: D19.2@103.731,71.628 103.858,71.501 D19.2 ; Q6.3 108.575,70.612 Q6.3@108.719,70.468
  SIGNAL/POWER1 w1.5: R23.2 D19.2@103.731,71.628 ; D19.2@104.242,71.427 105.057,70.612 Q6.3 ; Rsense.2 Q6.3@108.719,70.468
NetD20_1: D20.1 Q8.1 R30.2
NetD20_2: D20.2 Q8.3 R29.1 Rsense1.2
NetD21_1: D21.1 Q9.1 R36.2
NetD21_2: D21.2 Q9.3 R35.1 Rsense2.2
NetG1_3: G1.3 U9.11 | length 60.7
  SIGNAL/POWER2 w0.762: U9.11@36.703,64.643 36.703,13.273 37.149,12.827 41.275,12.827 43.235,10.867 43.235,9.248 G1.3
NetG1_4: G1.4 U9.14 | length 56.8
  SIGNAL/POWER2 w0.762: U9.14 44.326,62.1 46.355,60.071 46.355,13.843 45.339,12.827 G1.4
NetJ6_N: J6.N U10.8
NetJ6_P: J6.P U10.6
NetJ8_Cs: J8.Cs U9.8 | length 63.6
  SIGNAL/POWER1 w0.762: J8.Cs 12.446,51.181 22.098,60.833 26.924,60.833 29.086,62.995 U9.8
NetJ8_Miso: J8.Miso U9.10 | length 64
  SIGNAL/POWER1 w0.762: J8.Miso 14.986,11.194 16.002,12.21 16.002,50.292 23.876,58.166 27.462,58.166 33.939,64.643 U9.10
NetJ8_Mosi: J8.Mosi U9.15 | length 73.4
  SIGNAL/POWER1 w0.762: J8.Mosi 17.526,45.212 33.401,61.087 45.974,61.087 46.866,61.979 U9.15
NetJ8_Sck: J8.Sck U9.9 | length 58.6
  SIGNAL/POWER2 w0.762: J8.Sck 20.066,50.546 31.623,62.103 31.623,62.611 31.626,62.614 U9.9
NetR3_1: R3.1 U2.4
NetR4_1: R4.1 U1.4 | length 2.5
  SIGNAL/POWER1 w0.762: U1.4 77.896,89.999 77.896,92.248 R4.1
NetR5_2: R5.2 R6.2 R7.2 R14.2 R15.2 R16.2 R22.2 U9.25 | length 51
  SIGNAL/POWER1 w0.762: U9.25@24.007,90.348 24.044,90.384 24.044,94.405 R5.2 24.08,97.359 25.654,98.933 54.483,98.933 57.786,95.63 R7.2
NetR6_1: R6.1 U2.2
NetR7_1: R7.1 U1.2 | length 8.6
  SIGNAL/POWER1 w0.8: R7.1@60.806,87.351 60.831,87.376 v1(62.611,87.376) ; v1(66.802,87.376) U1.2
  SIGNAL/POWER1 w1.52: R7.1 R7.1@60.806,87.276
  SIGNAL/POWER2 w0.8: v1(62.611,87.376) v1(66.802,87.376)
NetR11_1: R11.1 U3.4
NetR12_1: R12.1 U4.4
NetR13_1: R13.1 U5.4
NetR14_1: R14.1 U3.2
NetR15_1: R15.1 U4.2
NetR16_1: R16.1 U5.2
NetR17_1: R17.1 U10.4
NetR18_1: R18.1 U6.6 | length 3.6
  SIGNAL/POWER1 w0.762: U6.6@104.452,83.692 R18.1
NetR19_2: R19.2 U6.1 | length 6.2
  SIGNAL/POWER1 w0.762: R19.2 U6.1
NetR21_1: R21.1 U7.4
NetR22_1: R22.1 U7.2
NetR30_1: R30.1 U8.6
NetR32_2: R32.2 U8.1
NetR36_1: R36.1 U11.6
NetR38_2: R38.2 U11.1
NetU9_26: U9.26 U10.3
NetU9_27: U9.27 U10.2
pads on no net: J1.S1 J1.S2 J2.S1 J2.S2 J3.S1 J3.S2 J4.S1 J4.S2 J5.S1 J5.S2 J6.S1 J6.S2 J8.Int J9.S1 J9.S2 U9. U9.3 U9.4 U9.5 U9.6 U9.7 U9.12 U9.13 U9.16 U9.17 U9.18 U9.19 U9.20 U9.21 U9.22 U9.23 U9.24 U9.28 U10.9 U10.10 U10.11 U10.12 U10.13 U10.14 U10.15 U10.16 U10.17

## Other copper
SIGNAL/POWER1:
Multi-Layer:
  text "ESP32" at 20.701,79.883 h1.52
  text "I2C CAN-BUS Module" at 31.369,16.383 h1.52 r90

## Silkscreen, mask and mechanical layers (free items; w line width, h text height)
Top Overlay:
  lines w0.254: 32.512,15.621 ccw(c32.766,15.621) 32.766,15.367 52.324,15.367 ccw(c52.324,15.621) 52.578,15.621 52.578,55.245 ccw(c52.324,55.245) 52.324,55.499 32.766,55.499 ccw(c32.766,55.245) 32.512,55.245 32.512,15.621